# Altium PCB IvcBoard.PcbDoc (part 2 of 3)
Units mil, origin at the board's own origin, x right, y up, seen from the top; angles counter-clockwise.
Board outline 2900 x 5000 mil, 4 copper layers (Top Layer, GND 3, GND 2, Bottom Layer), stack 53.912 mil thick; 217 components, 141 nets, 662 pads, 224 vias.
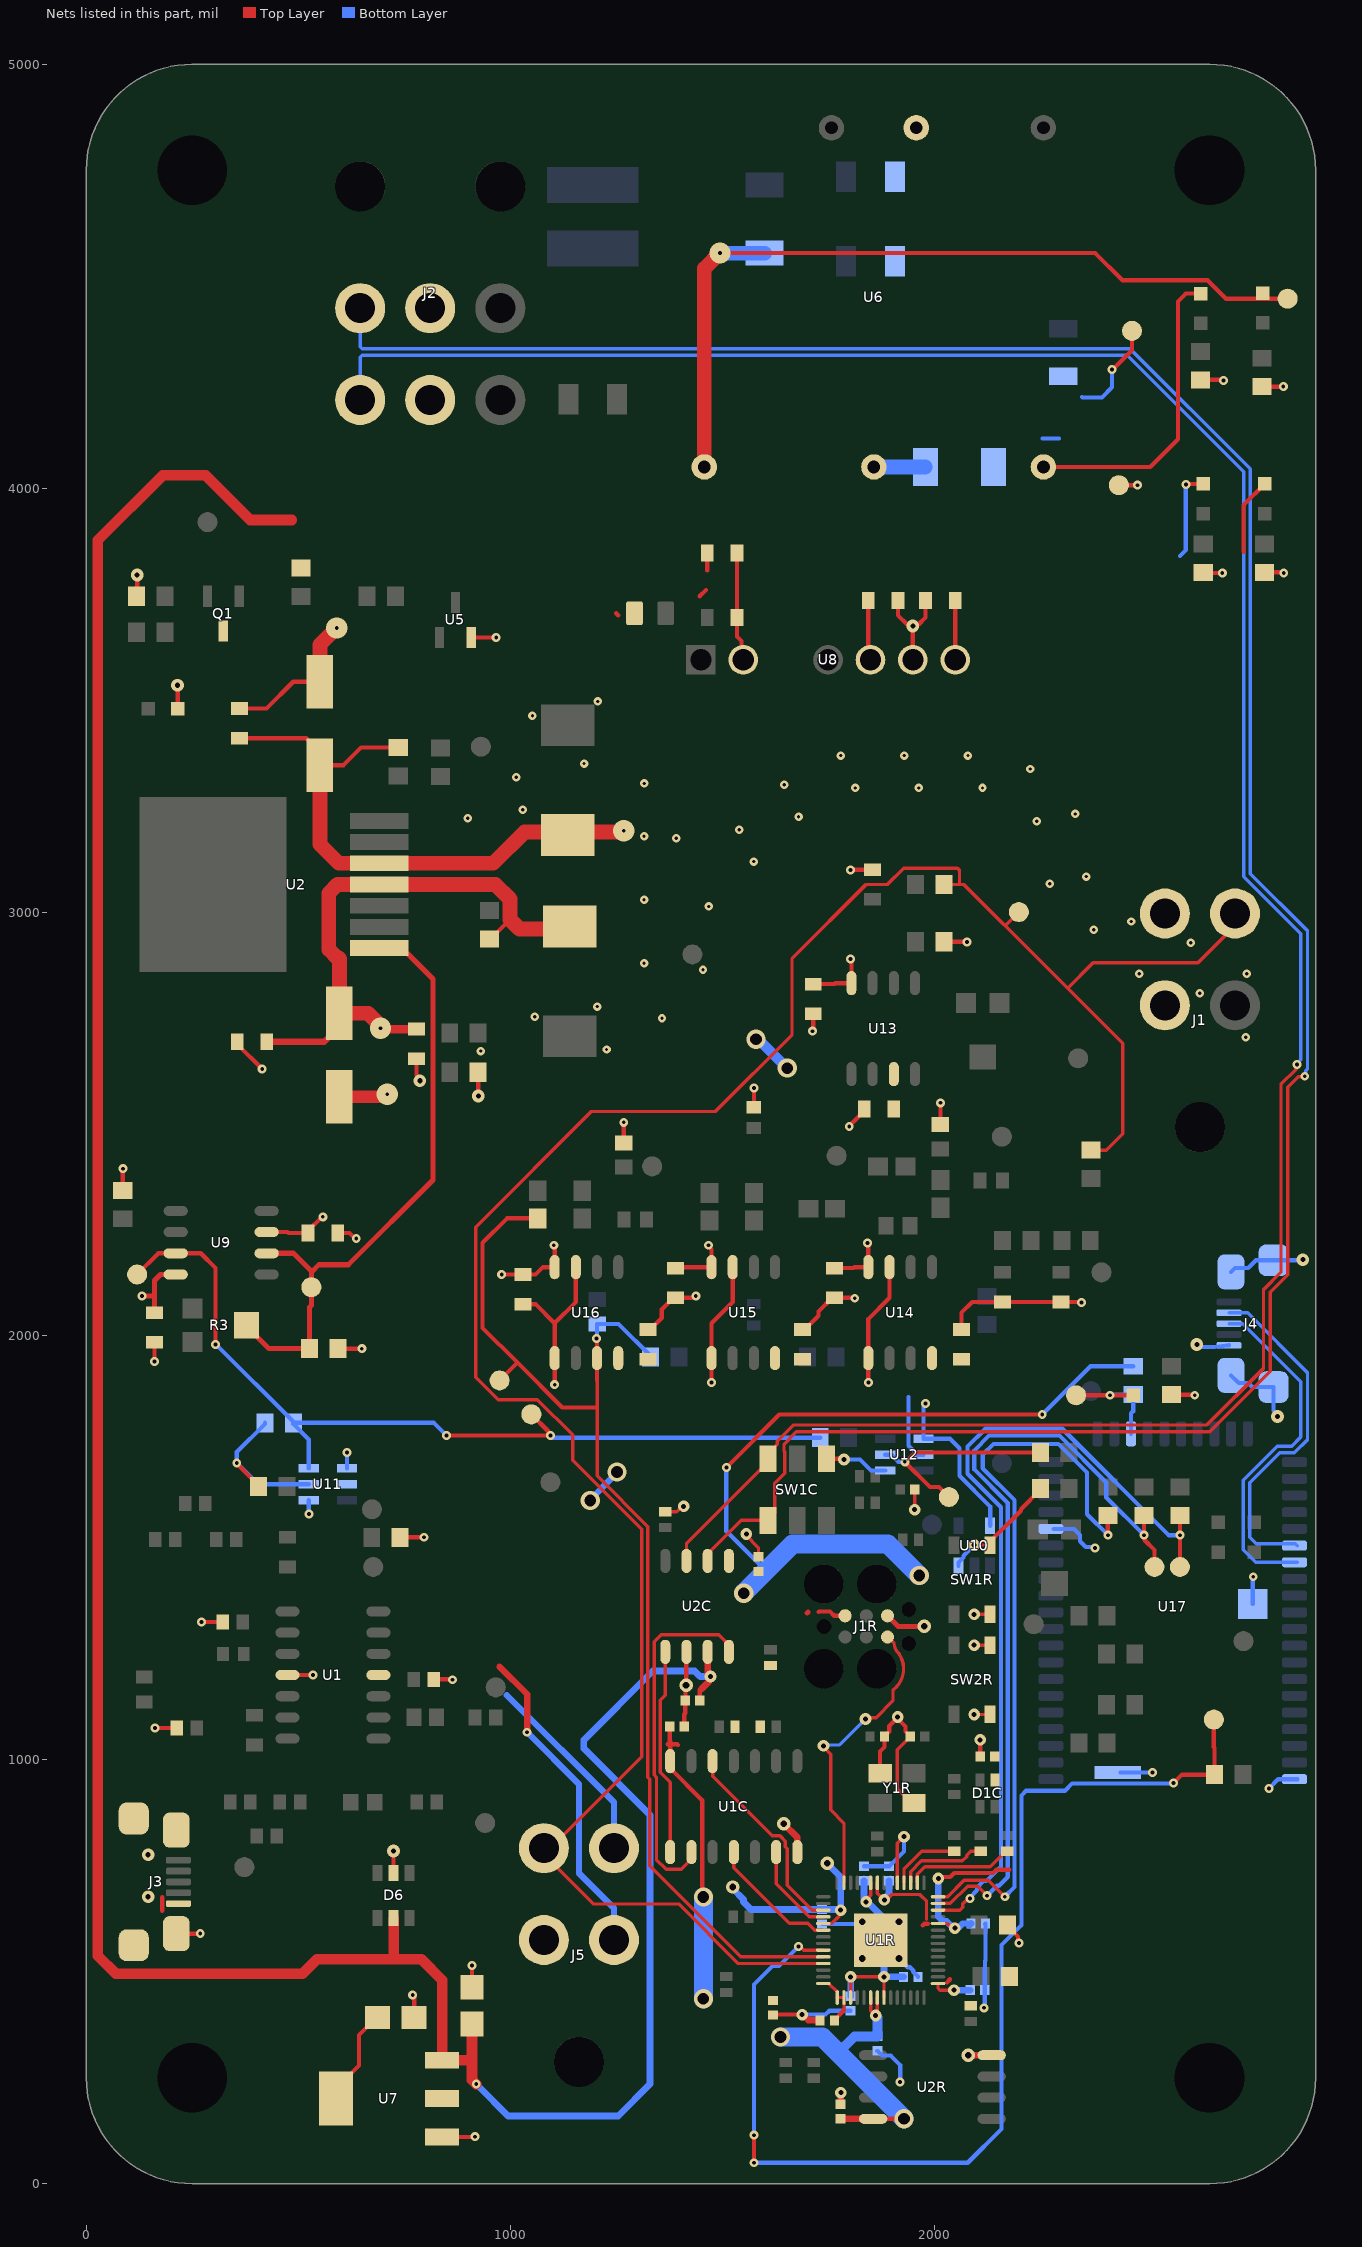
[diagram p4: the nets of this part, all layers, seen from the top]

## Part data (continued)
D2 D3 D4 D5 D7: library part LED_Green_0603_3.2V, "LED Green Vf= 3.2V If = 0.025A / 150060GS75000", Color=Green, Forward Current=25mA, Forward Voltage=3.2V, Package=0603, Supplier Part Number 1=732-4971-1-ND, ComponentLink1Description=Datasheet, ComponentLink1URL=https://www.we-online.de/katalog/datasheet/150060GS75000.pdf, Made By="Flip B", Supplier 1=Digi-Key
D6: library part RCLAMP0504S.TCT, "25V Clamp 6A (8/20µs) Ipp Tvs Diode Surface Mount SOT-23-6", Breakdown Voltage (Min)=6V, Clamping Voltage (Max)=25V, Reverse Standoff Voltage (Typ)=5V, Supplier Part Number 1=RCLAMP0504SCT-ND, Made By="Robert Pafford", Supplier 1=Digi-Key
D8 D9: library part LED_Yellow_0603, "LED Yellow Vf= 2V If = 0.020A / 150060YS75000", Color=Yellow, Forward Current=20mA, Forward Voltage=2V, Package=0603, Supplier Part Number 1=732-4981-1-ND, Made By="Robert Pafford", Supplier 1=Digi-Key
DNP1 DNP2: library part DNP_0402, "Do Not Populate 0402"
F1: "FUSE BRD MNT 1.5A 63VAC/VDC 1206"
J1 J5: library part "CONN_MOLEX_MINIFIT JR_4POS_R/A", "Molex Minifit Jr. 5569  / 4 Pos R/A Natural", Color=Natural, Current Per Pin=13A, Manufacturer=Molex, Supplier Part Number 1=WM13112-ND, ComponentLink1Description=Datasheet, ComponentLink1URL=https://www.molex.com/pdm_docs/sd/026013115_sd.pdf, Configuration="Right Angle", Created By="Flip B", Number of Positions=4, Pitch=4.2mm, Series="Minifit Jr 5569", Supplier 1=Digi-Key
J1R: library part TC2030_SWD, "TagConnect TC2030 ARM SWD 6-pin"
J2: library part "CONN_MOLEX_MINIFIT JR_6POS_R/A", "Molex Minifit Jr. 5569  / 6 Pos R/A Natural", Color=Natural, Current Per Pin=13A, Manufacturer=Molex, Supplier Part Number 1=WM1353-ND, ComponentLink1Description=Datasheet, ComponentLink1URL=https://www.molex.com/pdm_docs/ps/PS-5556-001.pdf, Configuration="Right Angle", Created By="Flip B", Number of Positions=8, Pitch=4.2mm, Series="Minifit Jr 5569", Supplier 1=Digi-Key
J3 J4: library part CONN_MICROUSB, "Amphenol Micro USB-B / USB2.0 5 Pin Right Angle SMD", Color=Silver, Current Per Pin=1.8A, Manufacturer=Amphenol, Supplier Part Number 1=609-4613-1-ND, ComponentLink1Description=Datasheet, ComponentLink1URL=https://cdn.amphenol-icc.com/media/wysiwyg/files/documentation/datasheet/inputoutput/io_usb_micro.pdf?__cf_chl_jschl_tk__=05693735e19256298f6ef6ca2bb2e65c376a4f56-1625503833-0-Abitsb0-ufjOXJYs_S3J3r2iTn-nObalbmXUksF1VvO_h_WEmRdMlUD1I8-hmWSEVWzY1pirKnrPZWfgY3851qyBZe5ZvnNQePLGIzUgdEIQBVUyW36RsbYpDLEWxJ4horD-5gChFgobLYqwmG5aHl0E8lIn_twwPPrOxilK2gP0q9t_CNOs_u5fMqXvXUrlsOv8tIE2NRlu6NVP8qtkL2GjhlkeTUbDMF8WvvpPDTFOgvZ4Y16Ej8F8AhWos88mo5B1HssXozw0XrkJQIqERITUu6rqloz9kf4ZzhBHtDAt-IkiAFY_Ds9SW8FYKKTtINJVpHZQ6Gyu1FFM4Dc9MO0maE8_mmNcwlxqyRoRk_MPWW8VyByXWM5RSp52jteRKw7FeI9WIYvCbPAOy0Eyib-aseIQsnGbglBcUY6_2xp8GYaJM38H3dNvBPsSOfJBPndKedwKHllxjkucXn6xsN0sDXkpGN-cu8_2bDTJ0g-uUucKSCooYX-ApSDNGpkA_p9zv1SOAD8c0zaZVmtiBsN75QpVz2rzq9_BFxOywPvR, Configuration="Right Angle", Created By="Flip B", Number of Positions=5, Pitch=0.65mm, Series=10118192, Supplier 1=Digi-Key
L1: library part "FIXED IND 1.1UH 3.24A 15 MOHM", "1.1 µH Unshielded Inductor 3.24 A 15mOhm Max Nonstandard"
L3: library part "INDUCTOR_6.8uH_Shielded Multilayer ±20% 550mA 325mΩ SMD 0805", "Shielded Multilayer Inductor 6.8uH ±20% 550mA 325mΩ SMD 0805", Case Code (Imperial)=0805, Case Code (Metric)=2012, Current Rating=550mA, DC Resistance (DCR)=250mR, Inductance=6.8uH, Max Operating Temperature=125°C, Min Operating Temperature=-55°C, Package Quantity=1, Saturation Current=110mA, Self Resonant Frequency=60MHz, Test Frequency=2MHz, Tolerance=20%, Case/Package=0805, Core Material=Ferrite, Height - Seated (Max)=0.057inch, Lead Free="Lead Free", Length=0.079inch, Mount="Surface Mount", Packaging="Tape and Reel", RoHS Compliant=Yes, Shielding=Shielded, Width=0.049inch
Q1: library part MMBT2907A-7-F, "PNP 60 V 600mA Surface Mount SOT-23", Amp Rating=600mA, Package="TO-236-3, SC-59, SOT-23-3", Power Dissipation="1.56W (Tc)", Supplier Part Number 1=MMBT2907A-FDICT-ND, BJT Type=PNP, ComponentLink1Description=Datasheet, ComponentLink1URL=https://media.digikey.com/pdf/Data%20Sheets/Diodes%20PDFs/MMBT2907A_Rev2016.pdf, Created By="Robert Pafford", Manufacturer_Part_Number=MMBT2907A-7-F, Rds (on)="50mOhm @ 3A, 4.5V", Supplier 1=Digi-Key, Vdss="20 V", Vendor=Digikey, Vgs (Max)=±10V, Vgs (th)="800mV @ 250µA"
R1: library part CMP-2000-03179-2, "RES Thick Film, 2.55kΩ, 1%, 0.1W, 100ppm/°C, 0603", Case Code (Imperial)=0603, Case Code (Metric)=1608, Max Operating Temperature=155°C, Min Operating Temperature=-55°C, Package Quantity=5000, Power Rating=100mW, Resistance=2.55kR, Temperature Coefficient=100ppm/°C, Tolerance=1%, Voltage Rating=75V, Case/Package=0603, Composition="Thick Film", Contact Plating=Tin, Depth=0.85mm, Height=0.45mm, Lead Free="Lead Free", Length=1.55mm, Military Standard=Not, Packaging="Tape and Reel", Radiation Hardening=No, Termination=SMD/SMT, Voltage Rating (DC)=75V, Weight=7.1E-05oz, Width=0.85mm
R1C R4C R4R R5R R6C: library part RESISTOR_10K_0402, "RES 10k OHM 1% 1/16W 0402", Digikey Part Numer=CR0603-JW-104ELFTR-ND, Supplier Part Number 1=YAG3436CT-ND, Tolerance="+/- 1%", Value  (Ohms)=10K, Made By="Robert Pafford", Supplier=Digikey, Supplier 1=Digi-Key, Wattage=1/16W
R1R R6R R7R: library part RESISTOR_1K_0402, "RES 1k OHM 1% 1/16W 0402", Digikey Part Numer=CR0603-JW-104ELFTR-ND, Supplier Part Number 1=13-AC0402FR-131KLCT-ND, Tolerance="+/- 1%", Value  (Ohms)=1K, Made By="Robert Pafford", Supplier=Digikey, Supplier 1=Digi-Key, Wattage=1/16W
R2: library part RESISTOR_4.7K_0603, "RES 4.7k OHM 5% 1/10W 0603", Digikey Part Numer=CR0603-JW-104ELFTR-ND, Supplier Part Number 1=RMCF0603JT4K70CT-ND, Tolerance="+/- 5%", Value  (Ohms)=4.7K, Made By="Robert Pafford", Supplier=Digikey, Supplier 1=Digi-Key, Wattage=1/10W
R2C R3C: library part RESISTOR_60.4_0402, "RES 60.4 OHM 1% 1/16W 0402", Digikey Part Numer=CR0603-JW-104ELFTR-ND, Supplier Part Number 1=13-AC0402FR-0760R4LCT-ND, Tolerance="+/- 1%", Value  (Ohms)=60.4, Made By="Robert Pafford", Supplier=Digikey, Supplier 1=Digi-Key, Wattage=1/16W
R2R R3R: library part RESISTOR_27_0402, "RES 27 OHM 1% 1/16W 0402", Digikey Part Numer=CR0603-JW-104ELFTR-ND, Supplier Part Number 1=YAG5278DKR-ND, Tolerance="+/- 1%", Value  (Ohms)=27, Made By="Robert Pafford", Supplier=Digikey, Supplier 1=Digi-Key, Wattage=1/16W
R3 R22 R40: "20 kOhms 0.1W, 1/10W J Lead Surface Mount Trimmer Potentiometer Cermet 1 Turn Top Adjustment", Package="1608 Bourns", Supplier Part Number 1=652-TC33X-2-203E, Check_prices=https://www.snapeda.com/parts/TC33X-2-203E/Bourns/view-part/312812/?ref=eda, Digi-Key_Part_Number=TC33X-2-203ECT-ND, MF=Bourns, MP=TC33X-2-203E, Purchase-URL=https://pricing.snapeda.com/search/part/TC33X-2-203E/?ref=eda, SnapEDA_Link=https://www.snapeda.com/parts/TC33X-2-203E/Bourns/view-part/312812/?ref=snap, Supplier 1=Mouser
R4: library part CMP-2100-03665-1, "Chip Resistor, 1.5 KOhm, +/- 1%, 0.1 W, -55 to 155 degC, 0603 (1608 Metric), RoHS, Tape and Reel", Case Code (Imperial)=0603, Case Code (Metric)=1608, Manufacturer=Yageo, Max Operating Temperature=155degC, Max Power Dissipation=100mW, Min Operating Temperature=-55degC, Package Description="2-Pin Surface Mount Device, Body 1.6 x 0.8 mm", Package Quantity=1, Resistance=1.5KOhm, Temperature Coefficient=100ppm/degreesC, Tolerance=1%, Voltage Rating=50V, Case/Package=0603, Composition=ThickFilm, Datasheet URL=http://www.yageo.com/NewPortal/yageodocoutput?fileName=/pdf/R-Chip/PYu-RC_Group_51_RoHS_L_5.pdf, Datasheet Version="Rev. 5, 10/2016", Depth=0.8mm, Height=0.022inch, Lead Free=LeadFree, Length=0.063inch, Manufacturer URL=http://www.yageo.com/, Military Standard=Not, Number of Pins=2, Number of Terminations=2, Package Reference=0603, Packaging=TapeandReel, Power Rating=100mW, REACH SVHC=NoSVHC, RoHSCompliant=true, Termination=SMD/SMT, Voltage Rating (DC)=50V, Width=0.031inch
R5: library part CMP-2000-03305-1, Manufacturer="Vishay Dale", Part Number=CRCW06033K57FKEA
R5C: library part RESISTOR_604_0402, "RES 604 OHM 1% 1/16W 0402", Digikey Part Numer=CR0603-JW-104ELFTR-ND, Supplier Part Number 1=13-AC0402FR-07604RLCT-ND, Tolerance="+/- 1%", Value  (Ohms)=604, Made By="Robert Pafford", Supplier=Digikey, Supplier 1=Digi-Key, Wattage=1/16W
R6: library part CMP-2000-03404-1, Manufacturer="Vishay Dale", Part Number=CRCW06034K22FKEA
R7: library part "RES 3.57K 1% 0603", "3.57 kOhms ±1% 0.1W, 1/10W Chip Resistor 0603 (1608 Metric) Automotive AEC-Q200 Thick Film"
R7C R8C: library part RESISTOR_200_0402, "RES 200 OHM 1% 1/16W 0402", Digikey Part Numer=CR0603-JW-104ELFTR-ND, Supplier Part Number 1=YAG3453CT-ND, Tolerance="+/- 1%", Value  (Ohms)=200, Made By="Robert Pafford", Supplier=Digikey, Supplier 1=Digi-Key, Wattage=1/16W
R8: library part CMP-2000-00290-1, Manufacturer=Panasonic, Part Number=ERJ-3EKF1781V
R9 R11 R13 R17 R18 R23 R42: library part RESISTOR_1K_0603, "RES 1k OHM 5% 1/8W 0603", Digikey Part Numer=CR0603-JW-104ELFTR-ND, Supplier Part Number 1=2019-RK73B1JTTD102JCT-ND, Tolerance="+/- 5%", Value  (Ohms)=1K, ComponentLink1Description=Datasheet, ComponentLink1URL=https://www.bourns.com/docs/product-datasheets/CRxxxxx.pdf, Made By="Robert Pafford", Supplier=Digikey, Supplier 1=Digi-Key, Wattage=1/8W
R10: library part RESISTOR_3.9K_0603, "RES 3.9k OHM 1% 1/10W 0603", Supplier Part Number 1=P3.90KHCT-ND, Tolerance="+/- 1%", Value  (Ohms)=3.9K, Made By="Robert Pafford", Supplier 1=Digi-Key, Wattage=1/10W
R12 R21: library part RESISTOR_10K_0603, "RES 10k OHM 5% 1/10W 0603", Digikey Part Numer=CR0603-JW-104ELFTR-ND, Supplier Part Number 1=2019-RK73B1JTTD103JCT-ND, Tolerance="+/- 5%", Value  (Ohms)=10K, ComponentLink1Description=Datasheet, ComponentLink1URL=https://www.bourns.com/docs/product-datasheets/CRxxxxx.pdf, Made By="Robert Pafford", Supplier=Digikey, Supplier 1=Digi-Key, Wattage=1/8W
R14: library part RC0603FR-0722KL, "RES 22K OHM 1% 1/10W 0603", Supplier Part Number 1=13-AC0402FR-073K09LCT-ND, Tolerance="+/- 1%", Value  (Ohms)=22K, Made By="Robert Pafford", Supplier 1=Digikey, Wattage=1/16W
R15 R19 R20 R36: library part RESISTOR_200_0603, "RES 220 OHM 5% 1/8W 0603", Supplier Part Number 1=2019-RK73B1JTTD221JCT-ND, Tolerance="+/- 5%", Value  (Ohms)=220, ComponentLink1Description=Digikey, ComponentLink1URL=https://www.digikey.com/en/products/detail/koa-speer-electronics-inc/RK73B1JTTD101J/9844701, Made By="John S", Supplier 1=Digi-Key, Wattage=1/8W
R16: library part RESISTOR_470K_0603, "RES 470k OHM 5% 1/10W 0603", Supplier Part Number 1=RMCF0603JT470KCT-ND, Tolerance="+/- 5%", Value  (Ohms)=470K, ComponentLink1Description=Datasheet, ComponentLink1URL=https://www.bourns.com/docs/product-datasheets/CRxxxxx.pdf, Made By="Robert P", Supplier 1=Digi-Key, Wattage=1/10W
R24 R28 R29: library part RESISTOR_240_0603, Digikey Part Numer=ERJ-3GEYJ241V, Supplier Part Number 1=P240GCT-ND, Tolerance="+/- 5%", Value  (Ohms)=240, ComponentLink1Description=Datasheet, ComponentLink1URL=https://www.bourns.com/docs/product-datasheets/CRxxxxx.pdf, Made By="John Ulm", Supplier=Digikey, Supplier 1=Digikey, Wattage=1/10W
R25 R27: library part CMP-2000-00194-1, Manufacturer=Panasonic, Part Number=ERJ-3EKF1073V
R26: library part CMP-2000-03969-1, Manufacturer=Yageo, Part Number=RC0603FR-07255KL
R30: library part CMP-26527-003233-1, "31.6kΩ ±1% 0.1W 0603 Thick Film Chip Resistor AEC-Q200 compliant", Case Code (Imperial)=0603, Case Code (Metric)=1608, Max Operating Temperature=155°C, Max Power Dissipation=100mW, Min Operating Temperature=-55°C, Resistance=31.6kR, Resistor Type="Thick Film", Temperature Coefficient=100ppm/°C, Tolerance=1%, Case/Package=0603, Construction=Rectangular, Contact Plating=Tin, Depth=0.8mm, Features="Automotive AEC-Q200", Height=0.022inch, Lead Free="Lead Free", Length=1.55mm, Military Standard=Not, Mount="Surface Mount", Number of Terminations=2, Packaging="Tape and Reel", Power Rating=100mW, Radiation Hardening=No, RoHS Compliant=Yes, Series=RMCF, Size Code=0603, Width=0.031inch
R31 R32: library part CMP-2000-00556-1, Manufacturer=Panasonic, Part Number=ERJ-3EKF5362V
R33 R34: library part CMP-2000-00644-1, Manufacturer=Panasonic, Part Number=ERJ-3EKF7870V
R35: library part CMP-2000-03363-2, "RES Thick Film, 453Ω, 1%, 0.1W, 100ppm/°C, 0603", Case Code (Imperial)=0603, Case Code (Metric)=1608, Max Operating Temperature=155°C, Max Power Dissipation=100mW, Min Operating Temperature=-55°C, Package Quantity=5000, Resistance=453R, Temperature Coefficient=100ppm/°C, Tolerance=1%, Voltage Rating=75V, Case/Package=0603, Composition="Thick Film", Contact Plating=Tin, Depth=0.85mm, Features="Automotive AEC-Q200", Height=0.02inch, Length=1.55mm, Military Standard=Not, Number of Pins=2, Number of Terminations=2, Packaging="Tape and Reel", Power Rating=100mW, Radiation Hardening=No, Termination=SMD/SMT, Weight=7.1E-05oz, Width=0.033inch, Working Voltage=75V
R37 R38 R39 R41: library part "RES 32 OHM 0.5% 1/10W 0603", "32 Ohms ±0.5% 0.125W, 1/8W Chip Resistor 0603 (1608 Metric) Automotive AEC-Q200, Moisture Resistant Thin Film"
SB1 SB2 SB4 SB5 SB6 SB7 SB8 SB9 SB10 SB11 SB12 SB13 SB14 SB16 SB18 SB19: library part JUMPER_0_0603, "0 Ohm Jumper No Fit for Solder Bridge", Value  (Ohms)=0, ComponentLink1Description=Digikey, ComponentLink1URL=https://www.digikey.com/en/products/detail/koa-speer-electronics-inc/RK73B1JTTD101J/9844701, Made By="Robert Pafford"
SB3: library part JUMPER_0_0603, "0 Ohm Jumper No Fit for Solder Bridge", Value  (Ohms)="0 (DNP)", ComponentLink1Description=Digikey, ComponentLink1URL=https://www.digikey.com/en/products/detail/koa-speer-electronics-inc/RK73B1JTTD101J/9844701, Made By="Robert Pafford"
SB15: "JUMPER 0OHM"
SW1C: library part CAS-220TA_CAN_TERM, "GOLD SWITCH FLUSH SLIDE DPDT 100MA 6V", Current Rating="100 mA", Supplier Part Number 1=CAS220JCT-ND, Voltage Rating=6VDC, Contact Finish=Gold, Made By="Robert Pafford", Supplier 1=Digi-Key, Switch Function=DPDT
SW1R SW2R: library part "Tactile Switch SMD", "WS-TASV J-Bend SMT Tact Switch, SPST-NO, 16VDC, 50mA, 260g", Manufacturer="Wurth Elektronik", Operating Temperature Max=85°C, Operating Temperature Min=-40°C, Rated Current=50mA, Rated Voltage=16VDC, Category="Tact Switches", Circuit=SPST-NO, ComponentLink1Description="Website Link", ComponentLink1URL=https://www.we-online.com/redexpert/article/434123025826?ad, ComponentLink2Description="Datasheet Link", ComponentLink2URL=https://www.we-online.com/redexpert/spec/434123025826?ad, Contact Material="Stainless Steel", Contact Plating=Silver, Height=2.5mm, Length=4.2mm, Manufacturer Part Number=434123025826, Match Code=WS-TASV, Mount="Surface Mount", Operation Force=260g, Packaging="Tape and Reel", Terminal Material="Copper Alloy", Terminal Plating=Silver, Washable=No, Width=3.2mm
TP1 TP2 TP3 TP4 TP5 TP6 TP7 TP8 TP9 TP10 TP11 TP12 TP13 TP14 TP15 TP16 TP17 TP18 TP19 TP20 TP21 TP22 TP23 TP24 TP25 TP26 TP27 TP28 TP29 TP30 TP31 TP32: library part TESTPOINT, Made By="Robert Pafford"
U1: "IC OPAMP AUDIO 4 CIRCUIT 14SOIC"
U1C: "CANbus Controller CAN 2.0 SPI Interface 14-SOIC", Made By="Robert Pafford", Max FD Rate="8 Mbps"
U1R: "Raspberry Pi RP2040", Crystal Frequency="12 MHz", Input Voltage=3.3V, Available Busses="SPI, I2C, PWM, USB", ComponentLink1Description=DigiKey, ComponentLink2Description=Datasheet, ComponentLink2URL=https://datasheets.raspberrypi.org/rp2040/rp2040-datasheet.pdf, Made By="Robert Pafford", Number of GPIOs=29
U2: "IC POWER 1 CIRCUIT DDPAK/TO263-7"
U2C: library part TJA1442AT, "CAN Interface IC High-Speed CAN Transceiver with Standby Mode", Supplier Part Number 1=771-TJA1442AT/0Z, Made By="Robert Pafford", Max Data Rate=5Mbps, Supplier 1=Mouser
U2R: "IC FLASH 128MBIT SPI/QUAD 8SOIC", Supplier Part Number 1=W25Q128JVSIQ-ND, Made By="Robert Pafford", Size=128M, Supplier 1=Digi-Key
U3 U4: "Diode Schottky 60 V 5A Surface Mount DO-214AB (SMC)"
U5: "MOSFET N-CH 100V 100MA SOT23-3"
U6: "DC DC CONVERTER +/-24V 15W"
U7: "IC REG LIN 3.3V 800MA SOT223-4", Manufacturer="Texas Instruments", Package=SOT-223-4, PartNumber=LM1117IMP-3.3/NOPB, Supplier Part Number 1=LM1117IMPX-3.3/NOPBCT-ND, Amp Out=800mA, Created By="Dylan T", Supplier 1=Digi-Key, Vin (Max)=15V, Vout (Min/Fixed)=3.3V
U8: "Isolated Module DC DC Converter 2 Output -5V 5V 100mA, 100mA 4.5V - 5.5V Input"
U10: library part CMP-08923-000001-1, "IC INVERTER SCHMITT 1CH 5SSOP", Manufacturer=Rohm, Max Junction Temp=+150°C, Max Supply Voltage=16V, Min Supply Voltage=3V, Package=SSOP5, Quiescent Current=0.2-1uA, Temperature="-40°C to +85°C", Temperature Range High=+85°C, Temperature Range Low=-40°C, Automotive=No, Category=IC, ComponentLink2Description=Datasheet, ComponentLink2URL=https://www.rohm.com/datasheet/BU4S584G2/bu4s584g2-e, Device Class L1="Integrated Circuits (ICs)", Device Class L2="Logic ICs", Device Class L3="Logic Gates", Digikey Description="IC INVERTER SCHMITT 1CH 5SSOP", Footprint Url=https://d1d2qsbl8m0m72.cloudfront.net/en/techdata_basic/ic/package/ssop5_1-e.pdf, Height=1.25mm, Ipc Land Pattern Name=SOT95P280X125-5, Lead Free=Yes, Logic Function Desc=Inverting, Manufacturer Part Number=BU4S584G2-TR, Mouser Description="Inverters IC SCHMITT TRIGGER SINGLE", Number Of Circuits=1, Number Of Inputs=1, Number Of Outputs=1, Octopart=https://octopart.com/bu4s584g2-tr-rohm-466637, Propagation Delay=50ns, RoHS=TRUE, Standoff Height=0mm
U11 U12: library part MAX4520EUT+T, "Analog Switch SPST Normally Open", On resistance=160Ohm, Package="SOT-23-6 Analog Devices", Supplier Part Number 1=MAX4520EUT+TCT-ND, Voltage=9-36V, Circuit=SPST, ComponentLink1Description=Datasheet, ComponentLink1URL=https://www.analog.com/media/en/technical-documentation/data-sheets/max4510-max4520.pdf, Created By="Flip B", MF="Analog Devices", Supplier 1=Digi-Key
U13: library part OPA228U, "General Purpose Amplifier 1 Circuit 8-SOIC"
U14 U15 U16: library part OPA2889ID, "Voltage Feedback Amplifier 2 Circuit 8-SOIC"
U17: library part BM83SM1-00AA, "Bluetooth Bluetooth v5.0 Transceiver Module 2.4GHz ~ 2.48GHz PCB Trace Surface Mount"
Y1R: library part CRYSTAL_12MHz_SMD_SMALL, "12 MHz ±20ppm Crystal 18pF 100 Ohms 4-SMD, No Lead (3.2x2.5mm)", Frequency="12 MHz", Load Capacitance=18pF, Supplier Part Number 1=2151-RH100-12.000-18-2030-EXT-TRCT-ND, ESR="100 Ohms", Made By="Robert Pafford", Supplier 1=Digi-Key

## Free pads (board coordinates)
  round 0 hole 165 unplated: 1(250,4750.04) 1(250.04,249.99) 1(2650,250.03) 1(2650.04,4749.96)

## Via types
v1: diameter 21, hole 9, Top Layer to Bottom Layer, tented both sides, 102 vias
v2: diameter 20, hole 8, Top Layer to Bottom Layer, tented both sides, 41 vias
v3: diameter 27.56, hole 11.81, Top Layer to Bottom Layer, tented both sides, 34 vias
v4: diameter 30, hole 12, Top Layer to Bottom Layer, tented both sides, 11 vias
v5: diameter 45.28, hole 27.56, Top Layer to Bottom Layer, tented both sides, 10 vias
v6: diameter 31.5, hole 15.75, Top Layer to Bottom Layer, tented both sides, 9 vias
v7: diameter 50, hole 13, Top Layer to Bottom Layer, 9 vias
v8: diameter 50, hole 9, Top Layer to Bottom Layer, tented both sides, 7 vias
v9: diameter 31.5/31.5/31.5/31.5 (per signal layer), hole 15.75, Top Layer to Bottom Layer, tented both sides, 1 vias

## Nets (pads, with @x,y where several pads share a name; then routed paths per layer and width w, separated by ;. In a path a pad name is that pad's centre, name@x,y a point inside that pad or via, vN(x,y) a via of type N, cw(c..) or ccw(c..) an arc to the next point about the centre after c; other vN are vias at no path point)
1v1_RP2040: C11R.1 C12R.1 C13R.1 U1R.23 U1R.45 U1R.50 | length 565.3
  Top Layer w7.87: U1R.45@1803.15,439.27 v3(1803.15,487.99) v3(1881.89,487.99) U1R.50@1881.89,439.27 ; v3(1840,665) 1840,670.33 1850.39,680.72 U1R.23@1850.39,709.94
  Bottom Layer w15.75: C11R.1@1803.15,442.13 v3(1803.15,487.99) ; C12R.1@1834.65,714.96 1834.65,673.55 1840,668.2 v3(1840,665) 1842.78,665 1881.89,625.89 v3(1881.89,487.99) C13R.1@1927.76,487.99
3v3: C1C.1 C3C.1 C3R.1 C4R.1 C5C.1 C5R.1 C6R.1 C7R.1 C8R.1 C9R.1 C10R.1 C20.1 D1C.4 J1R.2 R1C.1 R4C.1 R4R.1 R5R.1 SB5.1 SB19.2 U1C.14 U1R.1 U1R.10 U1R.22 U1R.33 U1R.42 U1R.43 U1R.44 U1R.48 U1R.49 U2C.5 U2R.8 U7.2 U7.4 | length 4956
  Top Layer w7.87: U1R.42@1725.39,472.24 U1R.42@1738.68,472.24 1751.97,472.24 U1R.43@1771.65,452.56 ; U1R.33@1738.68,613.98 1758.49,613.98 1775.76,631.25 1775.76,641.71 v3(1779.53,645.47) ; U1R.43@1771.65,439.27 U1R.44@1787.4,439.27 1787.4,410 ; U1R.48@1850.39,439.27 1850.39,408.41 1861.8,397 v3(1862.36,397) ; v3@1860.18,399.18 1866.14,405.14 1866.14,406.08 U1R.49@1866.14,439.27 ; U1R.22@1866.14,709.94 1866.14,684.84 1881.11,669.88 v3(1882.67,669.88) ; v3@1882.67,669.09 1887.22,669.09 1900.44,682.32 1965.97,682.32 1982.19,666.1 1982.19,655.47 1982.2,651.23 ; 1982.19,623.98 1982.19,651.22 ; U1R.1@2009.35,472.24 2009.35,461.11 2013.96,456.5 v3(2047.24,456.5) ; U1R.10@2009.35,613.98 2030.73,613.98 v3@2037.71,607
  Top Layer w9.84: U1C.14@1377.07,996.85 1377.07,980.61 1452.95,904.72 1452.95,679.45 v5(1455.83,676.57) ; U2R.8@1856.36,153.15 v5(1929.13,153.15)
  Top Layer w10: U7.4@589,201 589,224.62 643.18,278.8 643.18,350.68 684.5,392 C20.1@686.48,392 ; U7.2@839,201 U7.2@842.5,197.5 ; 1371,1037 1377.56,1037 ; C1C.1@1376.57,1078.54 1376.57,1044.43 1377.56,1043.44 1377.56,1037 ; U1C.14@1377.56,996.85 1377.56,1037 ; 1396,1035 1394,1037 1377.56,1037 ; v1(1510,1690) 1634.86,1814.86 2250.14,1814.86 v1@2255,1810 ; 1728,1349 1728.76,1349.76 1754.65,1349.76 1764.65,1339.76 J1R.2@1790.16,1339.76 ; C4R.1@1765.16,385.63 1765.16,386.42 1787,408.26 1787,410 ; 1973.42,609.5 1977.33,613.42 1985,613.42 ; v3(2010,720) 2013.36,723.36 2038.11,723.36 2047.53,732.78 2138.94,732.78 2146.66,740.5 2177.66,740.5 ; 2030.38,474.62 2037,481.23 2037,483
  Top Layer w11.81: 1700.79,1346.26 1702.7,1348.17
  Top Layer w15.75: C3R.1@1779.53,153.15 U2R.8@1856.36,153.15
  Bottom Layer w10: v5@1460,680 v5@1463.43,676.57 ; v1(1510,1690) 1510,1539.27 1594.64,1454.64 ; v3@2047,602 v3@2055.74,602 ; v1(2255.13,1814.86) 2368.77,1928.5 SB19.2@2470,1928.5
  Bottom Layer w15: v3@2055.74,602 2067.72,613.98 C6R.1@2086.98,613.98
  Bottom Layer w15.75: v6(1525,700) 1525,695.74 1550.28,670.45 1550.28,664.72 1568.15,646.85 C9R.1@1736.22,646.85 v3@1774.07,646.85 ; v9(1748.03,755.71) 1779.53,724.21 v3(1779.53,645.47) ; v3(1882.67,669.88) 1882.67,673.07 1893.81,684.21 C8R.1@1893.81,714.96 ; v3(2010,720) 2010,629.87 2021.14,618.74 2030.07,618.74 v3@2045.8,603 ; v3(2047.24,456.5) C7R.1@2085.24,456.5 ; C6R.1@2083.05,610.04 2083.83,610.04 2086.98,613.19 C6R.1@2086.98,613.98
  Bottom Layer w23.62: 1773.52,308.76 1812.4,347.64 C5R.1@1862.36,347.64 ; v3(1862.36,397) 1862.36,395.93 1866.14,392.16 C5R.1@1866.14,347.64
  Bottom Layer w45.28: v5(1455.83,436.57) v5(1455.83,676.57) ; v5@1551.18,1393.5 1666.68,1509 1891,1509 v5(1965,1435) ; v5(1637.8,346.26) 1736.02,346.26 1773.52,308.76 v5(1929.13,153.15)
  other v3: 2049,603
  other v5: 1551,1393
3V3_BT: D7.1 SB19.1 TP27.TP U17.23 | length 279.8
  Top Layer w10: TP27.TP@2335,1860 v1@2410,1860 ; v1(2415,1860) D7.1@2470,1860
  Bottom Layer w10: v1(2415,1860) 2416.5,1861.5 SB19.1@2470,1861.5 2470,1822 ; U17.23@2464.5,1769.21 2464.5,1817.5 2469,1822
5V: C4C.1 C19.1 C22.1 D6.5 J2.5 L3.1 Q1.3 R13.1 U2C.3 U7.3 | length 7154.5
  Top Layer w10: R13.1@506,3817 R13.1@508,3815 ; 1250,3705 1255,3700 ; 1447,3745 1462,3760 ; C4C.1@1447.13,1140 1447.13,1165.13 1450,1168 ; 1465,3805.99 C22.1@1465,3847
  Top Layer w15.75: 1451.13,1166.87 1468.67,1184.42 1468.67,1192.89 v3(1472.44,1196.65) 1472.44,1199.85 1465.94,1206.35 U2C.3@1465.94,1254.72
  Top Layer w25: 485,3925 386.67,3925 281.67,4030 180,4030 27.5,3877.5 27.5,537.5 70,495 510,495 545,530 790,530 840,480 U7.3@840,295 ; 725,540 D6.5@725,626.85 ; U7.3@856.48,291.48 910,291.48 ; C19.1@910,376.48 910,291.48 ; v1(920,235) 910,245 910,291.48
  Bottom Layer w16: v1@925,230 995,160 1255,160 1330,235 1330,870 1173.68,1026.32 1173.68,1047.03 1336.34,1209.69 1435.31,1209.69 1448.35,1196.65 v3(1472.44,1196.65)
+5: C21.1 C24.1 C30.1 C31.1 C32.1 D5.1 J5.1 U1.4 U8.6 U10.5 U11.1 U12.1 U13.7 U14.8 U15.8 U16.8 | length 1714.9
  Top Layer w10: U1.4@676.24,1200 U1.4@689.28,1200 ; U8.6@2050,3595 C21.1@2050,3735 C21.1@2050,3735.95 ; 2730,3850 2730,3960 D5.1@2780,4010
  Top Layer w15: 975,1220 1040,1155 v1(1040,1065)
  Bottom Layer w10: U11.1@615,1687.4 615,1724.73 v1(615.13,1724.86) ; v5@1248,1673 v5@1248,1679 ; v5(1580,2700) v5@1585,2700 ; v1(1980,1840.5) 1980,1837.52 1975,1832.52 U12.1@1975,1757.4 2037.6,1757.4 2059.8,1735.2 2059.8,1670.2 2132.4,1597.6 U10.5@2132.4,1552.24
  Bottom Layer w15: v1(1040,1065) 1162.29,942.71 1162.29,732.71 1245,650 J5.1@1245,570 ; v5(1188.78,1611.78) 1188.78,1613.78 v5@1248,1673
  Bottom Layer w25: v5@1585,2700 v5@1650,2635
  other v5: 1252,1679 1653.78,2631.78
+24: C9.1 C15.2 C16.1 C17.1 C43.2 D4.1 SB3.2 TP11.TP U2.5 U3.2 U6.3 U9.7 | length 3641.1
  Top Layer w10: C15.2@356,2694 356,2689 v1(415,2630) ; C16.1@361,3410 519.07,3410 551,3378.07 C17.1@551,3346.57 ; U9.7@425.57,2245 475,2245 477,2243 C9.1@523,2243 523,2248 556,2281 v1(558,2281) ; C17.1@551,3346.5 C17.1@551,3346.57 ; SB3.2@736,3388.5 648.5,3388.5 606.57,3346.57 C17.1@551,3346.57 ; v8@1269,3189 v8@1270,3190 ; v8(1495,4555) 2380,4555 2444.6,4490.4 2645.15,4490.4 2688.56,4447 TP11.TP@2834,4447
  Top Layer w35: C17.1@551,3346.5 551,3160 596,3115 U2.5@691,3115 960,3115 1034,3189 1136,3189 v8@1269,3189 ; U6.3@1458,4050 1458,4518 v8(1495,4555)
  Bottom Layer w35: v8@1495.71,4554.29 C43.2@1600,4554.29
  other v8: 1268,3192
-5: C23.2 C26.1 C38.1 C39.1 C40.1 D3.2 J5.3 U1.11 U8.4 U11.2 U12.2 U13.4 U14.4 U15.4 U16.4 | length 1655.5
  Top Layer w10: U1.11@474.72,1200 v1(535,1200) ; v1(980,2145) C40.1@1025.71,2145 ; C40.1@1030,2145 1060,2145 1077.28,2162.28 U16.4@1105,2162.28 v1@1105,2215 ; C39.1@1390,2160 1410,2160 1412.28,2162.28 U15.4@1475,2162.28 1475,2204.02 1470.1,2208.92 v1@1470.1,2214.9 ; C26.1@1715,2830 1765,2830 1767.28,2832.28 U13.4@1805,2832.28 v1@1805,2890 ; C38.1@1765,2160 1810,2160 1812.28,2162.28 U14.4@1845,2162.28 v1@1845,2220 ; C23.2@1845,3735 1845,3610 U8.4@1850,3605 ; v1@2595,4010 D3.2@2635,4010
  Bottom Layer w10: 1940,1856.27 1940,1741 1956,1725 1961,1720 U12.2@1975,1720 ; 2580,3840 2594,3854 v1(2594,4009)
  Bottom Layer w15: 992.3,1152.7 1245,900 J5.3@1245,776.54
  other v1: 1103,2214 1468,2214 1843,2219 1803,2889
-24: C8.1 C14.1 C15.1 C18.2 C44.1 D2.2 SB2.2 SB15.2 TP13.TP U2.4 U4.1 U5.2 U6.5 U9.4 | length 2654.7
  Top Layer w10: C18.2@597,2729.93 C18.2@597,2761.43 ; U5.2@908.5,3648 v1(967,3648) ; SB2.2@951,2936.5 953.5,2936.5 999.5,2982.5 1000,2983 ; U6.5@2258,4050 2510,4050 2575.22,4115.22 2575.22,4440.22 2594,4459 D2.2@2629,4459 ; v1(2420,4280) 2421.5,4280 2467,4325.5 TP13.TP@2467,4371
  Top Layer w12: v1(131.3,2093.96) 161,2093.96 ; C8.1@161,2055 161,2093.96 ; U9.4@211,2145 175,2145 161,2131 161,2093.96
  Top Layer w15: C15.1@426,2694 561.07,2694 C18.2@597,2729.93
  Top Layer w20: v8(694,2726) 696,2724 C14.1@779,2724
  Top Layer w35: 592.5,2891.5 572,2912 572,3044.5 592.5,3065 965.23,3065 999.5,3030.73 999.5,2982.5 1022,2960 U4.1@1141,2960 ; 594,2893 597,2890 C18.2@597,2761.43 664.52,2761.43 691.13,2734.81 691.13,2728.87 v8(694,2726)
  Bottom Layer w10: 2256,4117 2295,4117 ; 2349,4215 2350,4214 2396,4214 2420,4238 v1(2420,4280)
AmpedSignal: R3.2 R11.2 TP5.TP U2.1 U9.6 | length 1488.4
  Top Layer w12: R3.2@378.09,2025 378.09,2023.03 431.12,1970 R11.2@526.5,1970 526.5,2067.82 531,2072.32 TP5.TP@531,2115 531,2152.97 ; U9.6@425.57,2195 488.97,2195 531,2152.97 ; U2.1@691,2915 703.7,2902.3 757.7,2902.3 818,2842 818,2368 618,2168 548.68,2168 532.32,2151.65 531,2152.97
AudioSig: SB6.1 SB7.1 TP4.TP TP15.TP U9.3 U11.6 | length 2091.7
  Top Layer w10: TP4.TP@120,2145 170,2195 U9.3@211,2195 270,2195 305,2160 v1(305,1980) ; v1(850,1765) v1@1090,1765 ; TP15.TP@1050,1815 1090,1775 v1@1090,1770
  Bottom Layer w10: v1(305,1980) 306,1980 488.5,1797.5 SB7.1@488.5,1795 ; U11.6@525,1687.4 525,1756 488.5,1792.5 SB7.1@488.5,1795 ; v1(850,1765) 820,1795 SB7.1@488.5,1795 ; v1@1099.8,1760 SB6.1@1731.5,1760
  other v1: 1095,1765
BM83_USB_N: J4.2 U17.36 | length 829
  Bottom Layer w8: J4.2@2695.68,2054.59 2739.59,2054.59 2881,1913.18 2881,1755 2850.09,1724.09 2843.47,1724.09 2815.72,1724.09 2745,1653.37 2745,1525 2759.84,1510.16 2852.59,1510.16 U17.36@2857.32,1505.43
BM83_USB_P: J4.3 U17.37 | length 839.3
  Bottom Layer w8: J4.3@2695.68,2029 2728.07,2029 2746.69,2010.38 2865,1892.07 2865,1761.63 2843.47,1740.09 2809.09,1740.09 2729,1660 2729,1496 2758.94,1466.06 U17.37@2857.32,1466.06
BtMFB: SB14.2 U1R.14 | length 1771.8
  Top Layer w8: U1R.14@2009.35,676.97 2031.97,676.97 2070.66,715.66 2128.18,715.66 v1(2166.92,676.92)
  Top Layer w10: v1(2410,1530) SB14.2@2410,1576.5
  Bottom Layer w10: v1(2166.92,676.92) 2190,700 2190,1612.63 2115,1687.63 2115,1720 2140,1745 2293.24,1745 2360.52,1677.72 2360.52,1579.48 v1(2410,1530)
BTOut: SB12.2 TP29.TP U12.5 | length 521
  Top Layer w10: TP29.TP@2035,1620 2011.38,1643.62 1990.38,1643.62 v1(1931,1703) 1933.13,1703 1955.13,1725 SB12.2@2251.5,1725
  Bottom Layer w10: U12.5@1885,1720 1899,1720 1915.76,1703.24 1930.76,1703.24 v1(1931,1703)
BtP0_0: SB13.1 TP30.TP U1R.37 | length 2654.8
  Top Layer w8: v1(1680,559.74) 1683.52,559.74 1692.27,550.98 U1R.37@1738.68,550.98
  Top Layer w10: v1(1575,49.5) v1(1575,114.5) ; v1(2565,945) 2585,965 SB13.1@2661.5,965 2661.5,1028.5 2660,1030 TP30.TP@2660,1095
  Bottom Layer w10: v1(1575,49.5) 2079.5,49.5 2159.38,129.38 2159.38,563.34 2206,609.96 2206,916 2217.01,927.01 2308.71,927.01 2325.74,944.04 2564.04,944.04 v1(2565,945) ; v1(1575,114.5) 1575,470 1618.82,513.82 1634.08,513.82 v1(1680,559.74)
BtRx: SB16.2 TP31.TP U1R.12 | length 1968.2
  Top Layer w8: U1R.12@2009.35,645.47 2060.47,645.47 2067.45,652.45 2067.45,660.31 2072.13,665 2073.48,665 2081.17,672.68 v1(2084.69,672.68)
  Top Layer w10: TP31.TP@2580,1455 v1(2580,1530) SB16.2@2580,1576.5
  Bottom Layer w10: v1(2084.69,672.68) 2084.69,675.64 2101.24,692.2 2101.24,698.19 2116.96,713.91 2123.35,713.91 2158,748.56 2158,1596 2079,1675 2079,1739 2121,1781 2302.49,1781 2553.49,1530 v1(2580,1530)
BtTx: SB18.2 TP32.TP U1R.13 | length 1912.4
  Top Layer w8: U1R.13@2009.35,661.22 2038.57,661.22 2079.02,701.66 2102.84,701.66 v1(2125,679.5)
  Top Layer w10: SB18.2@2495,1576.5 v1(2495,1530) 2497.1,1527.9 2497.1,1517.9 2520,1495 TP32.TP@2520,1455
  Bottom Layer w10: v1(2125,679.5) 2148.3,702.8 2152.8,702.8 2174,724 2174,1606 2095,1685 2095,1730 2130,1765 2295.87,1765 2406.33,1654.53 2406.33,1618.67 v1(2495,1530)
CAN_N: J2.1 SW1C.1 U2C.6 | length 6151.4
  Top Layer w8: U2C.6@1465.94,1469.29 1465.94,1486.02 1544.69,1564.76 SW1C.1@1608.27,1564.76 1623.95,1580.45 1623.95,1652.36 1647.48,1675.89 1647.48,1726.62 1646.11,1727.99 1646.11,1744.7 1675.41,1774 2650.54,1774 2793.16,1916.62 2793.16,2102.72 2834.36,2143.91 2834.36,2586.75 2859.45,2611.83 2873.73,2611.83 v1(2874.5,2612.6)
  Bottom Layer w8: J2.1@646,4429.6 646,4334.02 650.69,4329.33 2462.3,4329.33 2746.31,4045.31 2746.31,3090.41 2881,2955.72 2881,2629.85 2876.99,2625.84 2876.99,2615.09 v1(2874.5,2612.6)
CAN_P: J2.4 SW1C.4 U2C.7 | length 6105.2
  Top Layer w7.87: U2C.7@1415.94,1469.29 1415.94,1509.65 1589.17,1682.87 1592.52,1682.87 1608.27,1698.62 SW1C.4@1608.27,1710.43
  Top Layer w8: SW1C.4@1608.27,1710.43 1608.27,1722.24 1630.11,1744.08 1630.11,1751.33 1668.78,1790 2643.91,1790 2777.16,1923.25 2777.16,2109.34 2818.36,2150.54 2818.36,2593.38 2854.01,2629.03 2854.01,2637.51 v1(2856.5,2640)
  Top Layer w10: J2.4@643,4205 J2.4@654.06,4205
  Bottom Layer w8: J2.4@646,4213.06 646,4308.64 650.69,4313.33 2455.67,4313.33 2730.31,4038.69 2730.31,3083.78 2865,2949.09 2865,2651.19 2856.5,2642.69 v1(2856.5,2640)
CANCLK_RP2CAN: U1C.6 U1R.32 | length 217.8
  Top Layer w7.87: U1C.6@1627.56,782.28 1627.56,707.99 1705.82,629.72 U1R.32@1738.68,629.72
CANRX_RP2CAN: U1C.2 U2C.4 | length 844.1
  Top Layer w7.87: U1C.2@1427.56,782.28 1427.56,765.55 1403.94,741.93 1367.77,741.93 1345.18,764.52 1345.18,959.47 1339.87,964.78 1339.87,1278.78 1356.16,1295.08 1492.32,1295.08 1515.94,1271.46 U2C.4@1515.94,1254.72
CANTX_RP2CAN: U1C.1 U2C.1 | length 487.4
  Top Layer w7.87: U2C.1@1365.94,1254.72 1365.94,1152.38 1353.74,1140.18 1353.74,970.53 1377.56,946.71 U1C.1@1377.56,782.28
DBG_TX_RP2040: J1R.5 U1R.27 | length 720.8
  Top Layer w7.8: J1R.5@1891.24,1289.76 1905.53,1275.47 1906.84,1268.51 ccw(c1940.16,1274.76) 1910.48,1258.38 ; 1911,1258 1911,1257.88 1918.44,1250.44
  Top Layer w7.87: v3(1739,1033) 1739,1030.62 1755.91,1013.71 1755.91,882.43 1787.4,850.93 U1R.27@1787.4,709.94 ; v3(1838.21,1096.26) 1841.36,1099.41 1863.38,1099.41 1903,1139.02 1903,1163.95 1905.31,1166.26 1905.55,1166.5 ccw(c1865.16,1214.76) 1917.84,1249.2
  Top Layer w10: J1R.5@1890.16,1289.76 J1R.5@1891.24,1289.76
  Bottom Layer w7.87: v3(1739,1033) 1741.03,1035.03 1776.98,1035.03 v3(1838.21,1096.26)
GND: C1C.2 C1R.2 C2C.1 C2R.2 C3C.2 C3R.2 C4C.2 C4R.2 C5.2 C5C.2 C5R.2 C6.2 C6R.2 C7.2 C7R.2 C8.2 C8R.2 C9.2 C9R.2 C10R.2 C11R.2 C12R.2 C13R.2 C14.2 C16.2 C17.2 C18.1 C19.2 C20.2 C21.2 C22.2 C23.1 C24.2 C25.2 C26.2 C30.2 C31.2 C32.2 C36.2 C37.2 C38.2 C39.2 C40.2 C41.2 C42.2 C44.2 C45.2 D1.2 D6.2 J1.2 J1.4 J1R.6 J2.2 J3.5 J3.6 J3.7 J3.8 J3.9 J4.5 J4.6 J4.7 J4.8 J4.9 J5.2 R2.2 R6C.2 R9.2 R11.1 R12.2 R16.2 R17.2 R18.2 R19.2 R20.2 R21.2 R23.2 R33.1 R34.1 R35.1 R36.2 R42.2 SW1C.6 SW1R.B1 SW1R.B2 SW2R.B1 SW2R.B2 TP12.TP U1C.7 U1R.19 U1R.57 U2C.2 U2R.4 U6.2 U6.4 U7.1 U8.2 U8.5 U10.3 U11.4 U12.4 U14.3 U14.5 U15.3 U15.5 U16.3 U16.5 U17.16 U17.50 U17.51 U17.52 Y1R.2 Y1R.4 | length 7743.1
  Top Layer w7.87: R6C.2@1365.94,1585.43 1392.52,1585.43 1405.31,1598.23 v3(1409.45,1598.23) ; v3(1557.13,1532.84) 1557.13,1529.29 1585.83,1500.59 C3C.2@1585.83,1478.7 ; SW1C.6@1746.06,1710.43 SW1C.6@1748.03,1708.46 ; U1R.57@1913.39,621.85 v6(1917.32,617.91) ; U1R.19@1913.39,709.94 1913.39,802.95 v3(1929.13,818.7) ; v3(1954.13,1590.35) C2C.1@1954.13,1637.6 ; v3(2094.49,1107.09) SW2R.B1@2131.89,1107.09 ; v3(2094.49,1270.47) SW2R.B2@2131.89,1270.47 ; v3(2094.49,1343.31) 2128.03,1343.31 SW1R.B1@2128.15,1343.19 ; v3(2094.49,1506.69) SW1R.B2@2130,1506.69
  Top Layer w8: C1R.2@1943.5,1054.92 1943.5,1054.13 1913.32,1023.95 1913.32,931.83 1946.85,898.31 Y1R.4@1952.76,898.31 ; SW1R.B1@2128.15,1343.19 SW1R.B1@2130.83,1345.87
  Top Layer w9.84: C5C.2@2108.86,1007.68 v3(2108.86,1047.05)
  Top Layer w10: R2.2@86,2343.5 v1@86,2390 ; J3.8@112,562.39 J3.8@129.61,580 ; R16.2@119,3745 119,3767.5 120,3768.5 v4(120,3795) ; v1(161,1940) C8.2@161,1985 ; v1(162.5,1075) C6.2@213.38,1075 ; 179,644 179,676 ; J3.7@212.39,589.95 J3.7@217.32,594.87 ; J3.6@212.39,834.05 J3.6@213.35,835 ; v4@215,3530 216,3529 D1.2@216,3480 ; J3.7@217.32,589.95 v1(269,590) v1(269,590) ; v1(272,1325) C7.2@322,1325 ; C16.2@356,3480 C16.2@361,3480 ; 381,3480 425,3480 488.43,3543.43 C17.2@551,3543.43 ; v8@588.44,3668 v8@591,3668 ; C9.2@593,2243 621.02,2243 634.02,2230 v1(637,2230) ; R11.1@593.5,1970 648,1970 v1@649,1969 ; v4(725,785) 725,735 D6.2@730,730 ; R12.2@740.5,1525 v1(797,1525) ; v1(770,445) 770,442.02 773.52,438.5 C20.2@773.52,392 ; C14.2@779,2654 779,2615.41 787,2607.41 v4(787,2602) ; U7.1@803.65,125.13 820.78,108 U7.1@824,108 ; J2.2@811.35,4429.6 J2.2@811.63,4429.88 ; C5.2@819.24,1190 v1@867,1190 ; U7.1@839,110.45 916.55,110.45 v1@917,110 ; C19.2@910,463.52 v1(910,515) ; v4@921,2567 924.5,2570.5 R9.2@924.5,2622 ; C40.2@1030,2075 1060,2075 1105,2030 ; v1(1105,1885) U16.5@1105,1947.72 1105,2030 ; U16.3@1155,2162.28 1155,2080 1105,2030 ; v1@1265,2505 1268,2502 R34.1@1268,2455.54 ; C32.2@1325,2015 1330,2015 1357.5,2042.5 1357.5,2062.5 1385,2090 C39.2@1390,2090 1430,2090 1431.9,2091.9 1432.92,2091.9 1435,2093.98 v1@1435,2095 ; C1C.2@1410.83,1078.54 1410.83,1107.83 1412.87,1109.87 C4C.2@1412.87,1140 1413.94,1141.06 1413.94,1174.87 v6(1415,1175.94) ; v6@1413.94,1178.94 1415.47,1180.47 1415.47,1254.25 U2C.2@1415.94,1254.72 ; v1(1475,1890) U15.5@1475,1947.72 1475,2030 1525,2080 U15.3@1525,2162.28 ; C22.2@1535,3847 1535,3650 1545.86,3639.14 1545.86,3614.14 U8.2@1550,3610 ; R35.1@1575,2539.23 v1(1575,2585) ; C10R.2@1615.87,399 v3(1689,399) ; C31.2@1690,2015 1695,2015 1727.5,2047.5 1727.5,2057.5 1760,2090 C38.2@1765,2090 v1@1810,2090 ; v1@1715,2720 C26.2@1715,2760 ; SW1C.6@1746.06,1710.43 1783.57,1710.43 v3@1785,1709 ; v1(1800,2494) 1800,2495 1835,2530 C24.2@1835,2535 ; v1@1805,3100 C25.2@1855,3100 ; v1(1845,1890.5) U14.5@1845,1947.72 1845,2040 1895,2090 U14.3@1895,2162.28 ; U6.4@1858,4050 U6.4@1858,4050 ; Y1R.2@1872.76,968.31 1872.76,1019.76 1883.27,1030.27 C2R.2@1883.27,1054.92 1883.27,1055.71 1894.29,1066.73 1894.29,1080.01 1912,1097.72 v3@1912,1099 ; v3@1915,1099 1915,1096.26 1932.48,1078.78 1932.48,1066.73 1943.5,1055.71 C1R.2@1943.5,1054.92 ; C23.1@1915,3735 1915,3700 1936.17,3678.83 1946.17,3678.83 v4(1950,3675) ; U8.5@1950,3595 v4(1950,3675) ; U6.2@1956.73,4848.73 U6.2@1958,4850 ; C21.2@1980,3735 1980,3695 1963.83,3678.83 1953.83,3678.83 v4(1950,3675) ; R33.1@2015,2498.54 v1(2015,2550) ; R23.2@2023.5,2930 v1@2080,2930 ; C30.2@2065,2015 2065,2055 2090,2080 C37.2@2162,2080 C36.2@2300,2080 v1@2350,2080 ; SW1R.B2@2130,1505 2130,1506.69 2130,1512.68 2205,1587.68 2205,1591 2251.5,1637.5 R42.2@2251.5,1640 ; R21.2@2173.5,610 2173.5,607.5 2198.14,582.86 2198.14,571.86 v1@2200,570 ; TP12.TP@2436,4007 v1@2474,4007 ; R36.2@2560,1861.5 2613.5,1861.5 v1(2615,1860) ; R18.2@2628,4255.5 2681.5,4255.5 v1(2683,4254) ; R20.2@2635,3801.5 2636.5,3800 v1(2680,3800) ; R17.2@2774,4239.5 v1(2824,4239.5) v1@2829,4239.5 ; R19.2@2780,3801.5 2823.5,3801.5 v1(2825,3800)
  Top Layer w11.81: J1R.6@1890.16,1339.76 1915.07,1314.85 v6(1976.7,1314.85)
  Top Layer w15.75: v6(1645.06,849.21) 1677.56,816.71 U1C.7@1677.56,782.28 U1C.7@1677.1,782.74 ; v3(1689,399) 1690.31,399 1703.68,385.63 C4R.2@1730.91,385.63 ; C3R.2@1779.53,187.4 v3@1779.53,214.53 ; v6(2080.61,303.15) U2R.4@2135.88,303.15
  Top Layer w30: C18.1@597,2564.57 699.16,2564.57 704.59,2570 v8(710,2570)
  Top Layer w35: C17.2@551,3543.43 551,3630.56 v8@588.44,3668 ; J2.2@811.63,4429.88 J2.2@812.18,4430.42
  Bottom Layer w10: v1@525,1580 U11.4@525,1612.6 ; v3@1690,405 1696,399 1744,399 1752.87,407.87 C11R.2@1803.15,407.87 ; C9R.2@1736.22,612.6 1819.58,612.6 1823.67,616.69 v6@1833.31,616.69 ; v3@1790,1710 1791.54,1708.46 1825.54,1708.46 1851.4,1682.6 U12.4@1885,1682.6 ; C12R.2@1834.65,749.21 C8R.2@1893.81,749.21 1894.59,749.21 1929.13,783.75 v3(1929.13,818.7) 1929.13,819.13 v3@1930,820 ; C5R.2@1866.14,313.39 1866.93,313.39 1877.95,302.36 1897.64,302.36 1920,280 v1(1920,240) ; v6(1917.32,531.3) 1937.82,510.8 1943.34,510.8 1950.98,503.15 1950.98,499.8 1962.01,488.78 C13R.2@1962.01,487.99 ; U10.3@2057.6,1457.76 2057.6,1465.63 2069.41,1477.44 2069.41,1481.61 2090,1502.2 v3@2090,1505 ; v1(2117.88,415) v1@2118.68,415.81 ; C7R.2@2119.49,454 2119.49,415.51 v1@2120,415 ; C7R.2@2119.49,456.5 2119.49,509.49 2120,510 2120,526 ; C6R.2@2120,612.74 C6R.2@2121.24,613.98 2121.24,526 ; U17.16@2282.52,1544.8 2330.2,1544.8 2344.47,1530.53 2344.47,1515.53 2357.9,1502.1 2377.9,1502.1 v1(2380,1500) ; U17.52@2440,970 v1(2515,970) ; v1@2616,1862 v1@2617,1862 ; v4(2620,1980) 2626.12,1973.88 2662.22,1973.88 J4.5@2695.68,1977.82 ; J4.7@2700.61,1906.95 2718.8,1888.76 2741.24,1888.76 2750.61,1879.39 J4.8@2801,1879.39 2801,1824.41 2810,1815.41 v4(2810,1810) ; J4.6@2700.61,2151.05 2709.75,2160.19 2741.24,2160.19 2759.66,2178.61 J4.9@2801,2178.61 2868.61,2178.61 v4(2870,2180) ; U17.51@2751.9,1367.64 2751.9,1430.9 v1(2753,1432) ; v1(2790,932.51) 2811.74,954.25 U17.50@2857.32,954.25
  Bottom Layer w35: U6.4@1870,4050 C44.2@1979.29,4050
  other v1: 917,111 2200.24,568.15 864,1189 525.13,1579.86 650,1970 2348,2079 1813,2089 1438,2094 86.31,2394.61 1268,2504 1713,2719 2078,2929 1803,3099 2480,4007
  other v2: 931,2672.11 1227.33,2675.77 2735.03,2704.57 1358.18,2749.11 1057.61,2752.55 1205.59,2777.08 2627.14,2808.79 2484.29,2854.55 2737.95,2854.54 1454.94,2863.73 1315.77,2878.87 2605.53,2927.42 2376.29,2958.64 2465.36,2977.71 1468.21,3013.14 1315.77,3028.87 2272.76,3067.18 2359.3,3083.77 1574.28,3119.2 1392.23,3173.82 1315.77,3178.87 1540.88,3193.95 2241.94,3213.98 900.2,3221.32 1680.34,3225.27 2332.68,3231.39 1029.59,3241.77 1814.3,3292.77 1964.3,3292.77 2114.3,3292.77 1646.94,3300.02 1316.67,3303.4 1014.69,3318.23 2226.61,3337.46 1174.23,3350.42 1780.02,3369.23 1930.02,3369.23 2080.02,3369.23 1052.61,3463.36 1206.8,3496.84
  other v3: 1780,215 1914,1101 1787.4,1708.46
  other v4: 146,677 146,776 925,2566 215,3535
  other v6: 1830.71,531.3 1830.71,617.91
  other v8: 590.91,3670.46
HydrophoneIn: J1.3 J5.4 R24.2 SB8.2 TP17.TP U1R.39 | length 5574.7
  Top Layer w8: J5.4@1079.65,776.54 1310,1006.89 1310,1543.79 1147.42,1706.37 1147.42,1766.54 1064.34,1849.62 971.41,1849.62 919,1902.04 919,2256.85 1191.65,2529.5 1483.44,2529.5 1665,2711.06 1665,2890.56 1839.44,3065 1890,3065 1928.68,3103.68 2055.31,3103.68 2060,3099 2060,3065 ; J5.4@1100,755 1101.18,755 1196.18,660 1397.96,660 1538.47,519.49 U1R.39@1738.68,519.49 ; R24.2@2023.5,3065 2036.32,3065 2060,3065 ; TP17.TP@2200,3000 2170,2970 2165,2970 ; SB8.2@2370,2438.5 2406.5,2438.5 2445,2477 2445,2690 2315,2820 ; J1.3@2710,2996.54 2710,2967.28 2622.72,2880 2375,2880 2315,2820 ; 2060,3065 2070,3065 2165,2970 ; 2165,2970 2167.5,2967.5 2315,2820
HydrophoneInFiltered: C29.2 R27.2 SB11.1 TP24.TP U1R.38 U16.7 | length 2741.5
  Top Layer w8: 1205,1831 1205,1670 1324.93,1550.07 1324.93,958.6 1329.5,954.03 1329.5,749.67 1543.94,535.24 U1R.38@1738.68,535.24 ; 1205,1832 1205,1895
  Top Layer w10: TP24.TP@975,1895 1015,1935 ; C29.2@1065,2277.49 992.49,2277.49 935,2220 935,2018.94 1016.97,1936.97 1122.94,1831 1202,1831 ; v1(1204,1994) 1205,1993 U16.7@1205,1947.72 1205,1895
  Bottom Layer w10: v1@1205,1997 R27.2@1205,2028.46 1255.54,2028.46 1331.5,1952.5 SB11.1@1331.5,1950
INT_RP2CAN: U1C.4 U1R.34 | length 306.5
  Top Layer w7.87: U1C.4@1527.56,782.28 1527.56,745.44 1658.83,614.17 1702.55,614.17 1718.49,598.23 U1R.34@1736.22,598.23
LEDB_RP2CAN: R8C.1 U1R.18 | length 168.1
  Top Layer w7.87: U1R.18@1929.13,709.94 1929.13,742.8 1970.59,784.25 R8C.1@2047.24,784.25
LEDG_RP2CAN: R7C.1 U1R.17 | length 213.3
  Top Layer w7.87: U1R.17@1944.88,709.94 1944.88,736.27 1970.22,761.61 2066.9,761.61 2076.76,771.47 2076.76,774.39 2086.61,784.25 R7C.1@2110.24,784.25
LEDR_RP2CAN: R5C.1 U1R.16 | length 255
  Top Layer w7.87: U1R.16@1960.63,709.94 1960.63,729.75 1978.6,747.72 2132.76,747.72 2169.29,784.25 R5C.1@2173.23,784.25
LPFOut: SB1.1 SB7.2 U11.5 | length 388.9
  Top Layer w10: v1(355,1700) 355,1699 SB1.1@394.75,1659.25
  Top Layer w12: SB1.1@393.5,1658 SB1.1@406.5,1645
  Bottom Layer w10: SB7.2@421.5,1795 421.5,1792.5 355,1726 v1(355,1700) 405,1650 U11.5@525,1650
MISO_RP2CAN: U1C.12 U1R.31 | length 485.7
  Top Layer w7.87: U1C.12@1477.56,996.85 1477.56,961.44 1618.24,820.76 1636.57,820.76 1649.31,808.02 1649.31,794.69 1653.94,790.06 1653.94,703.88 1712.35,645.47 U1R.31@1738.68,645.47